# Altium PCB Main-PCB-v1.0.PcbDoc (part 3 of 5)
Units mil, origin at the board's own origin, x right, y up, seen from the top; angles counter-clockwise.
Board outline 8760 x 2778 mil, 2 copper layers (Top Layer, Bottom Layer), stack 57 mil thick; 252 components, 204 nets, 813 pads, 473 vias.
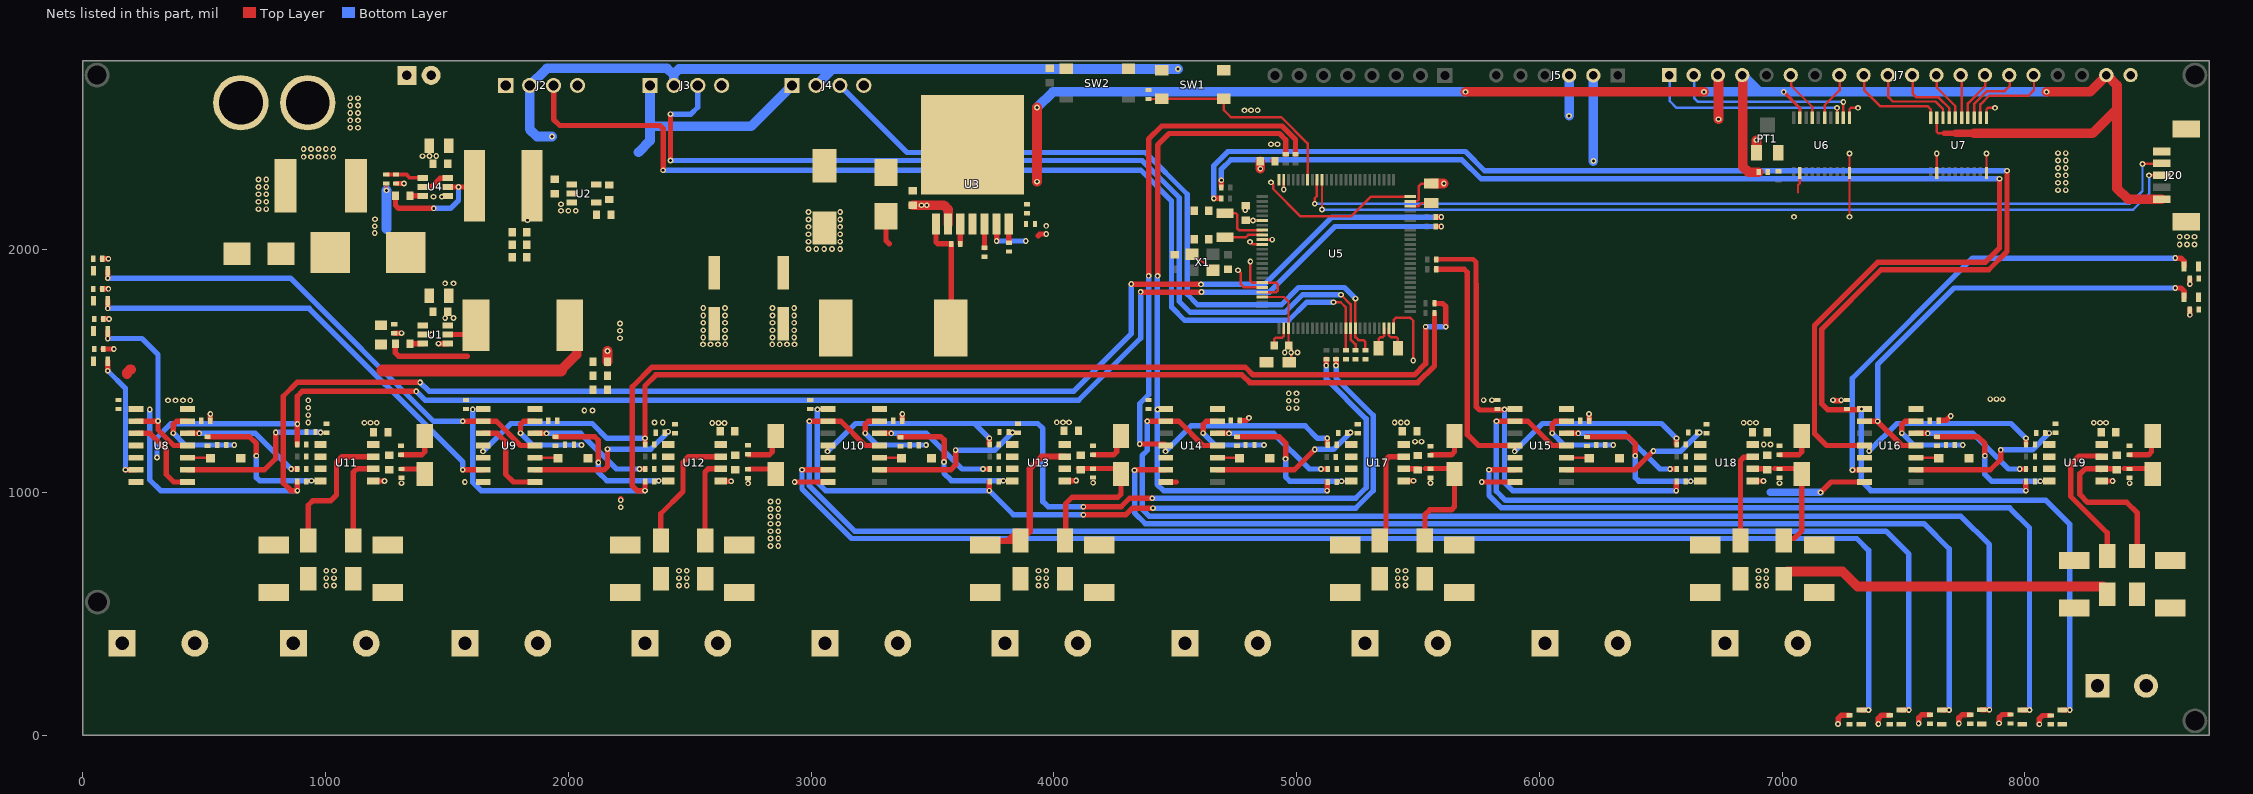
[diagram p2: the nets of this part, all layers, seen from the top]

## Part data (continued)
R24 R25 R26 R39 R41 R43 R51 R52 R53 R54 R55 R56 R57 R58 R59 R72 R74 R76 R84 R85 R86 R87 R88 R89: library part RC0402FR-074K7L, "RES 4.7K OHM 1% 1/16W 0402", Case Code (Imperial)=0402, Case Code (Metric)=1005, LCSC Part Number=C105871, Manufacturer=Yageo, Max Operating Temperature=155°C, Max Power Dissipation=63mW, Min Operating Temperature=-55°C, Power Rating=62.5mW, Resistance=4.7kR, Resistance Tolerance=1%, Resistor Type="Thick Film", Temperature Coefficient=100ppm/°C, Voltage Rating=50V, Case/Package=0402, Category="Chip SMD Resistors", ComponentLink1Description=https://datasheet.ciiva.com/22661/1686128-22661342.pdf?src-supplier=Element14, ComponentLink1URL=https://datasheet.ciiva.com/22661/1686128-22661342.pdf?src-supplier=Element14, ComponentLink2Description=https://datasheet.ciiva.com/7850/1018594-7850022.pdf?src-supplier=Element14, ComponentLink2URL=https://datasheet.ciiva.com/7850/1018594-7850022.pdf?src-supplier=Element14, ComponentLink3Description=https://datasheet.ciiva.com/7850/1018594-7850023.pdf?src-supplier=Element14, ComponentLink3URL=https://datasheet.ciiva.com/7850/1018594-7850023.pdf?src-supplier=Element14, ComponentLink4Description=https://datasheet.ciiva.com/15215/getdatasheetpartid-328119-15215035.pdf?src-supplier=Verical, ComponentLink4URL=https://datasheet.ciiva.com/15215/getdatasheetpartid-328119-15215035.pdf?src-supplier=Verical, Construction=Rectangular, Depth=0.5mm, Features="Moisture Resistant", Height=0.32mm, Height - Seated (Max)=0.016inch, Item Type=Resistor, Lead Free="Lead Free", Length=1mm, Manufacturer Part Number=RC0402FR-074K7L, Military Standard=Not, Number of Pins=2, Number of Terminations=2, Packaging="Tape and Reel", Pricing 1="10000=0.00085 (USD)", Reach SVHC Compliant=Yes, RoHS=Yes, RoHS Compliant=Yes, Series=RC, Size Code=0402, Stock 1=2420000, Supplier 1=Avnet, Supplier Part Number 1=RC0402FR-074K7L, Termination=SMD/SMT, Tolerance=1%, Voltage Rating (DC)=50V, Width=0.5mm
R27 R28 R29 R30 R31 R32 R60 R61 R62 R63 R64 R65: library part RC0402FR-072K4L, "RES 2.4K OHM 1% 1/16W 0402", Case Code (Imperial)=0402, Case Code (Metric)=1005, LCSC Part Number=C112296, Manufacturer=Yageo, Max Operating Temperature=155°C, Max Power Dissipation=63mW, Min Operating Temperature=-55°C, Package Quantity=1, Resistance Tolerance=1%, Resistor Type="Thick Film", Supplier Part Number 1=3635539, Temperature Coefficient=100ppm/°C, Voltage Rating=50V, Case/Package=0402, Category="Chip SMD Resistors", ComponentLink1Description=https://datasheet.ciiva.com/7849/1018594-7849930.pdf?src-supplier=Element14, ComponentLink1URL=https://datasheet.ciiva.com/7849/1018594-7849930.pdf?src-supplier=Element14, ComponentLink2Description=https://datasheet.ciiva.com/7849/1018594-7849931.pdf?src-supplier=Element14, ComponentLink2URL=https://datasheet.ciiva.com/7849/1018594-7849931.pdf?src-supplier=Element14, ComponentLink3Description=https://datasheet.ciiva.com/2453/pyu-r-int-thick-7-2453428.pdf?src-supplier=Digi-Key, ComponentLink3URL=https://datasheet.ciiva.com/2453/pyu-r-int-thick-7-2453428.pdf?src-supplier=Digi-Key, ComponentLink4Description=https://datasheet.ciiva.com/2453/pyu-r-int-thick-7-2453429.pdf?src-supplier=Digi-Key, ComponentLink4URL=https://datasheet.ciiva.com/2453/pyu-r-int-thick-7-2453429.pdf?src-supplier=Digi-Key, ComponentLink5Description=https://datasheet.ciiva.com/2453/pyu-r-int-thick-7-2453427.pdf?src-supplier=Digi-Key, ComponentLink5URL=https://datasheet.ciiva.com/2453/pyu-r-int-thick-7-2453427.pdf?src-supplier=Digi-Key, ComponentLink6Description=https://datasheet.ciiva.com/12667/pyu-rc0402-51-rohs-l-6-r-12667437.pdf?src-supplier=Mouser, ComponentLink6URL=https://datasheet.ciiva.com/12667/pyu-rc0402-51-rohs-l-6-r-12667437.pdf?src-supplier=Mouser, ComponentLink7Description=https://datasheet.ciiva.com/17423/pyu-rc0402-51-rohs-l-6-r-17423915.pdf?src-supplier=Future+Electronics, ComponentLink7URL=https://datasheet.ciiva.com/17423/pyu-rc0402-51-rohs-l-6-r-17423915.pdf?src-supplier=Future+Electronics, Construction=Rectangular, Depth=0.5mm, Features="Moisture Resistant", Height=0.016inch, Item Type=Resistor, Lead Free="Lead Free", Length=0.039inch, Manufacturer Part Number=RC0402FR-072K4L, Military Standard=Not, Number of Terminations=2, Packaging="Tape and Reel", Power Rating=63mW, Pricing 1="10000=0.001, 50000=0.001, 200000=0.0009, 300000=0.0009, 750000=0.0009, 1000000=0.0009, 2000000=0.0009, 3000000=0.0008, 7500000=0.0008 (USD)", Reach SVHC Compliant=Unknown, RoHS=Yes, RoHS Compliant=Yes, Series=RC, Stock 1=20000, Supplier 1="Future Electronics", Termination=SMD/SMT, Tolerance=1%, Voltage Rating (DC)=50V, Width=0.02inch
R33 R34 R35 R66 R67 R68: library part RC0402FR-0756KL, "RES 56K OHM 1% 1/16W 0402", Case Code (Imperial)=0402, Case Code (Metric)=1005, LCSC Part Number=C114756, Manufacturer=Yageo, Max Operating Temperature=155°C, Max Power Dissipation=63mW, Min Operating Temperature=-55°C, Package Quantity=1, Power Rating=62.5mW, Resistance Tolerance=1%, Resistor Type="Thick Film", Supplier Part Number 1=3873767, Temperature Coefficient=100ppm/°C, Voltage Rating=50V, Case/Package=0402, Category="Chip SMD Resistors", ComponentLink1Description=https://datasheet.ciiva.com/46412/1018594-46412840.pdf?src-supplier=Element14, ComponentLink1URL=https://datasheet.ciiva.com/46412/1018594-46412840.pdf?src-supplier=Element14, ComponentLink2Description=https://datasheet.ciiva.com/2453/pyu-r-int-thick-7-2453479.pdf?src-supplier=Digi-Key, ComponentLink2URL=https://datasheet.ciiva.com/2453/pyu-r-int-thick-7-2453479.pdf?src-supplier=Digi-Key, ComponentLink3Description=https://datasheet.ciiva.com/2453/pyu-r-int-thick-7-2453480.pdf?src-supplier=Digi-Key, ComponentLink3URL=https://datasheet.ciiva.com/2453/pyu-r-int-thick-7-2453480.pdf?src-supplier=Digi-Key, ComponentLink4Description=https://datasheet.ciiva.com/2453/pyu-r-int-thick-7-2453478.pdf?src-supplier=Digi-Key, ComponentLink4URL=https://datasheet.ciiva.com/2453/pyu-r-int-thick-7-2453478.pdf?src-supplier=Digi-Key, ComponentLink5Description=https://datasheet.ciiva.com/5558/pyu-rc0402-51-rohs-l-6-r-5558279.pdf?src-supplier=Mouser, ComponentLink5URL=https://datasheet.ciiva.com/5558/pyu-rc0402-51-rohs-l-6-r-5558279.pdf?src-supplier=Mouser, ComponentLink6Description=https://datasheet.ciiva.com/7850/1018594-7850045.pdf?src-supplier=Element14, ComponentLink6URL=https://datasheet.ciiva.com/7850/1018594-7850045.pdf?src-supplier=Element14, ComponentLink7Description=https://datasheet.ciiva.com/7850/1018594-7850044.pdf?src-supplier=Element14, ComponentLink7URL=https://datasheet.ciiva.com/7850/1018594-7850044.pdf?src-supplier=Element14, Construction=Rectangular, Depth=0.5mm, Features="Moisture Resistant", Height=0.016inch, Item Type=Resistor, Lead Free="Lead Free", Length=0.039inch, Manufacturer Part Number=RC0402FR-0756KL, Military Standard=Not, Number of Terminations=2, Packaging="Tape and Reel", Pricing 1="10000=0.001, 50000=0.001, 300000=0.0009, 1000000=0.0009, 3000000=0.0008 (USD)", Reach SVHC Compliant=No, RoHS=Yes, RoHS Compliant=Yes, Series=RC, Stock 1=2610000, Supplier 1="Future Electronics", Technology="THICK FILM", Termination=SMD/SMT, Tolerance=1%, Width=0.02inch, Working Voltage=50V
R48 R49 R50 R81 R82 R83: library part RC0603FR-07120RL, "RES 120 OHM 1% 1/10W 0603", Case Code (Imperial)=0603, Case Code (Metric)=1608, LCSC Part Number=C114640, Manufacturer=Yageo, Max Operating Temperature=155°C, Max Power Dissipation=100mW, Min Operating Temperature=-55°C, Package Quantity=1, Resistance Tolerance=1%, Resistor Type="Thick Film", Supplier Part Number 1=311-120HRCT-ND, Temperature Coefficient=100ppm/°C, Voltage Rating=50V, Case/Package=0603, Category="Chip SMD Resistors", ComponentLink1Description=https://datasheet.ciiva.com/2553/pyu-r-int-thick-7-2553512.pdf?src-supplier=Digi-Key, ComponentLink1URL=https://datasheet.ciiva.com/2553/pyu-r-int-thick-7-2553512.pdf?src-supplier=Digi-Key, ComponentLink2Description=https://datasheet.ciiva.com/7746/443971-7746248.pdf?src-supplier=Element14, ComponentLink2URL=https://datasheet.ciiva.com/7746/443971-7746248.pdf?src-supplier=Element14, ComponentLink3Description=https://datasheet.ciiva.com/2553/pyu-r-int-thick-7-2553513.pdf?src-supplier=Digi-Key, ComponentLink3URL=https://datasheet.ciiva.com/2553/pyu-r-int-thick-7-2553513.pdf?src-supplier=Digi-Key, ComponentLink4Description=https://datasheet.ciiva.com/7746/443971-7746249.pdf?src-supplier=Element14, ComponentLink4URL=https://datasheet.ciiva.com/7746/443971-7746249.pdf?src-supplier=Element14, ComponentLink5Description=https://datasheet.ciiva.com/2553/pyu-r-int-thick-7-2553514.pdf?src-supplier=Digi-Key, ComponentLink5URL=https://datasheet.ciiva.com/2553/pyu-r-int-thick-7-2553514.pdf?src-supplier=Digi-Key, ComponentLink6Description=https://datasheet.ciiva.com/46395/443971-46395021.pdf?src-supplier=Element14, ComponentLink6URL=https://datasheet.ciiva.com/46395/443971-46395021.pdf?src-supplier=Element14, Construction=Rectangular, Depth=0.8mm, Features="Moisture Resistant", Height=0.022inch, Lead Free="Lead Free", Length=1.6mm, Manufacturer Part Number=RC0603FR-07120RL, Military Standard=Not, Number of Pins=2, Number of Terminations=2, Packaging="Tape and Reel", Power Rating=100mW, Pricing 1="1=0.10000, 10=0.02400, 100=0.00970, 1000=0.00436, 2500=0.00378 (USD)", REACH SVHC="No SVHC", Resistance=120R, RoHS=Yes, RoHS Compliant=Yes, Series=RC, Size Code=0603, Stock 1=839061, Supplier 1=Digi-Key, Termination=SMD/SMT, Tolerance=1%, Voltage Rating (DC)=50V, Width=0.031inch
SB1 SB2 SB3 SB4 SB5 SB6 SB7 SB8 SB9 SB10 SB11 SB12 SB13 SB14 SB15 SB16 SB17 SB18 SB19 SB20: "Solder Bridge ON", Item Type="Solder Bridge", Manufacturer Part Number="Solder Bridge 0402"
SW1 SW2: "No NO 50mA 4.5mm 100000 260gf 12V -30℃~+85℃ 4.5mm 4.3mm Black Round Button Brick nogging SPST SMD Tactile Switches ROHS", LCSC Part Number=C381037, Manufacturer="XKB Connectivity", Package=Custom, ComponentLink1Description=LCSC, ComponentLink1URL=https://www.lcsc.com/product-detail/Tactile-Switches_XKB-Connectivity-TS-1109S-C-B_C381037.html, Item Type=Switch, Manufacturer Part Number=TS-1109S-C-B
U1 U4: "IC REG BUCK ADJ 2A SOT23-THIN", LCSC Part Number=C5383002, Manufacturer="Texas Instruments", Supplier Part Number 1=595-LMR51420YDDCR, Category="Integrated Circuits (ICs)", ComponentLink1Description=LCSC, ComponentLink1URL=https://www.lcsc.com/product-detail/DC-DC-Converters_Texas-Instruments-LMR51420YDDCR_C5383002.html, Item Type=IC, Manufacturer Part Number=LMR51420YDDCR, Pricing 1="1=1.56, 10=1.41, 50=1.33, 100=1.13, 1000=0.77, 10000=0.769 (USD)", RoHS=No, Stock 1=6752, Supplier 1=Mouser
U2: "SPX3819 Series 3.3 V 500 mA Fixed Output SMT LDO Regulator - SOT-23-5", LCSC Part Number=C9055, Manufacturer=MaxLinear, Supplier Part Number 1=23R9703, Category="Voltage Regulators - Linear", ComponentLink1Description=LCSC, ComponentLink1URL=https://www.lcsc.com/product-detail/Linear-Voltage-Regulators-LDO_MaxLinear-SPX3819M5-L-3-3-TR_C9055.html, Item Type=IC, Manufacturer Part Number=SPX3819M5-L-3-3/TR, RoHS=Yes, RoHS Compliant=Yes, Supplier 1=Newark
U3: "IC REG BUCK ADJ 5A TO263-7", Case/Package=TO-263, LCSC Part Number=C2877272, Manufacturer="TI National Semiconductor", Max Operating Temperature=125°C, Max Supply Voltage=40V, Min Input Voltage=8V, Min Operating Temperature=-40°C, Output Current=5A, Output Voltage=37V, Package Quantity=500, Quiescent Current=4.2mA, Supplier Part Number 1=926-LM2679SXADJNOPB, Switching Frequency=260kHz, Category="Voltage Regulators - Switching", ComponentLink1Description=https://datasheet.ciiva.com/6596/lm2679-6596695.pdf?src-supplier=Digi-Key, ComponentLink1URL=https://datasheet.ciiva.com/6596/lm2679-6596695.pdf?src-supplier=Digi-Key, ComponentLink2Description=https://datasheet.ciiva.com/6596/lm2679-6596699.pdf?src-supplier=Digi-Key, ComponentLink2URL=https://datasheet.ciiva.com/6596/lm2679-6596699.pdf?src-supplier=Digi-Key, ComponentLink3Description=https://datasheet.ciiva.com/6596/lm2679-6596693.pdf?src-supplier=Digi-Key, ComponentLink3URL=https://datasheet.ciiva.com/6596/lm2679-6596693.pdf?src-supplier=Digi-Key, ComponentLink4Description=https://datasheet.ciiva.com/41457/001013915-da-01-en-ic-reg-bu-lm2679sx-adj-nopb-to-263-7-tid-41457948.pdf?src-supplier=Conrad, ComponentLink4URL=https://datasheet.ciiva.com/41457/001013915-da-01-en-ic-reg-bu-lm2679sx-adj-nopb-to-263-7-tid-41457948.pdf?src-supplier=Conrad, Efficiency=84%, Item Type=IC, Lead Free="Contains Lead", Manufacturer Part Number=LM2679SX-ADJ/NOPB, Min Supply Voltage=8V, Mounting Technology="Surface Mount", Number of Outputs=1, Output Type=Adjustable, Packaging="Tape and Reel", Pricing 1="1=6.97, 10=6.26, 50=5.92, 100=5.13, 1000=3.72, 10000=3.72 (USD)", RoHS=Yes, RoHS Compliant=Yes, Series="SIMPLE SWITCHER®", Stock 1=3995, Supplier 1=Mouser, Synchronous Rectifier=No
U5: "MCU 32-bit ARM Cortex M4 RISC 1MB Flash 3.3V 100-Pin LQFP Frame", Case/Package=LQFP, LCSC Part Number=C1337293, Manufacturer=STMicroelectronics, Max Operating Temperature=85°C, Min Operating Temperature=-40°C, Supplier Part Number 1=511-STM32F413VGT6, Category=Microcontrollers, ComponentLink1Description=https://4donline.ihs.com/images/VipMasterIC/IC/SGST/SGST-S-A0003533273/SGST-S-A0003533273-1.pdf?hkey=52A5661711E402568146F3353EA87419&src-supplier=Newark, ComponentLink1URL=https://4donline.ihs.com/images/VipMasterIC/IC/SGST/SGST-S-A0003533273/SGST-S-A0003533273-1.pdf?hkey=52A5661711E402568146F3353EA87419&src-supplier=Newark, ComponentLink2Description=https://4donline.ihs.com/images/VipMasterIC/IC/SGST/SGST-S-A0003533273/SGST-S-A0003533273-1.pdf?hkey=52A5661711E402568146F3353EA87419&src-supplier=Farnell, ComponentLink2URL=https://4donline.ihs.com/images/VipMasterIC/IC/SGST/SGST-S-A0003533273/SGST-S-A0003533273-1.pdf?hkey=52A5661711E402568146F3353EA87419&src-supplier=Farnell, ComponentLink3Description=http://www.farnell.com/datasheets/2581760.pdf?src-supplier=Element14, ComponentLink3URL=http://www.farnell.com/datasheets/2581760.pdf?src-supplier=Element14, ComponentLink4Description=http://www.st.com/content/ccc/resource/technical/document/datasheet/group3/f6/1d/4a/d9/f9/96/43/2a/DM00282249/files/DM00282249.pdf/jcr:content/translations/en.DM00282249.pdf?src-supplier=Digi-Key, ComponentLink4URL=http://www.st.com/content/ccc/resource/technical/document/datasheet/group3/f6/1d/4a/d9/f9/96/43/2a/DM00282249/files/DM00282249.pdf/jcr:content/translations/en.DM00282249.pdf?src-supplier=Digi-Key, Core Architecture=ARM, Interface=I2C,SPI,USB,IrDA,MMC,SDIO,UART,USART,EBI/EMI, Item Type=IC, Manufacturer Part Number=STM32F413VGT6, Memory Format=FLASH, Memory Size=1MB, Number of I/Os=81, Oscillator Type=Internal, Packaging=Tray, Peripherals="Brown-out Detect/Reset,POR,PWM,WDT,DMA,LCD", Pricing 1="1=14.15, 10=13, 50=12.46, 100=10.98, 1000=9.77, 10000=9.77 (USD)", RoHS=Yes, RoHS Compliant=Yes, Series=STM32F4, Stock 1=941, Supplier 1=Mouser
U6 U7: "IC 8-BIT TRNSTR 15KV ESD 20TSSOP", Case/Package=TSSOP, High Level Output Current=-20uA, LCSC Part Number=C53406, Low Level Output Current=20uA, Manufacturer="Texas Instruments", Max Operating Temperature=85°C, Max Supply Voltage=5.5V, Min Operating Temperature=-40°C, Min Supply Voltage=1.2V, Package Quantity=2000, Quiescent Current=3.5uA, Supplier Part Number 1=595-TXB0108PWR, Category="Logic ICs", Channel Type=Bidirectional, ComponentLink1Description=https://datasheet.ciiva.com/1508/1789049-1508727.pdf?src-supplier=Element14, ComponentLink1URL=https://datasheet.ciiva.com/1508/1789049-1508727.pdf?src-supplier=Element14, ComponentLink2Description=https://datasheet.ciiva.com/22653/1633674-22653426.pdf?src-supplier=Farnell, ComponentLink2URL=https://datasheet.ciiva.com/22653/1633674-22653426.pdf?src-supplier=Farnell, ComponentLink3Description=https://datasheet.ciiva.com/1628/txb0108-1628712.pdf?src-supplier=Newark, ComponentLink3URL=https://datasheet.ciiva.com/1628/txb0108-1628712.pdf?src-supplier=Newark, ComponentLink4Description=https://datasheet.ciiva.com/4834/sces643e-127095-4834434.pdf?src-supplier=Mouser, ComponentLink4URL=https://datasheet.ciiva.com/4834/sces643e-127095-4834434.pdf?src-supplier=Mouser, ComponentLink5Description=https://datasheet.ciiva.com/15096/getdatasheetpartid-189652-15096226.pdf?src-supplier=Verical, ComponentLink5URL=https://datasheet.ciiva.com/15096/getdatasheetpartid-189652-15096226.pdf?src-supplier=Verical, ComponentLink6Description=https://datasheet.ciiva.com/28499/1811182-28499660.pdf?src-supplier=Element14, ComponentLink6URL=https://datasheet.ciiva.com/28499/1811182-28499660.pdf?src-supplier=Element14, ComponentLink7Description=https://datasheet.ciiva.com/1899/txb0108-1899608.pdf?src-supplier=Digi-Key, ComponentLink7URL=https://datasheet.ciiva.com/1899/txb0108-1899608.pdf?src-supplier=Digi-Key, ComponentLink8Description=https://datasheet.ciiva.com/1899/txb0108-1899607.pdf?src-supplier=Digi-Key, ComponentLink8URL=https://datasheet.ciiva.com/1899/txb0108-1899607.pdf?src-supplier=Digi-Key, ComponentLink9Description=https://datasheet.ciiva.com/1899/txb0108-1899609.pdf?src-supplier=Digi-Key, ComponentLink9URL=https://datasheet.ciiva.com/1899/txb0108-1899609.pdf?src-supplier=Digi-Key, ComponentLink10Description=https://datasheet.ciiva.com/14287/txb0108-14287509.pdf?src-supplier=Avnet, ComponentLink10URL=https://datasheet.ciiva.com/14287/txb0108-14287509.pdf?src-supplier=Avnet, ComponentLink11Description=https://datasheet.ciiva.com/48701/001073833-da-01-en-ic-8-bit-trnstr-txb0108pwr-tssop-20-tid-48701979.pdf?src-supplier=Conrad, ComponentLink11URL=https://datasheet.ciiva.com/48701/001073833-da-01-en-ic-8-bit-trnstr-txb0108pwr-tssop-20-tid-48701979.pdf?src-supplier=Conrad, Data Rate=100Mbps, Height=1.15mm, Item Type=IC, Lead Free="Lead Free", Length=6.5mm, Logic Function=Translator, Manufacturer Part Number=TXB0108PWR, Mounting Technology="Surface Mount", Number of Bits=8, Number of Channels=8, Number of Circuits=1, Number of Inputs=8, Output Current=20uA, Output Type=3-STATE, Packaging="Tape and Reel", Pins=20, Pricing 1="1=1.73, 10=1.55, 50=1.47, 100=1.21, 1000=0.789, 10000=0.694 (USD)", Propagation Delay=4ns, Radiation Hardening=No, Reach SVHC Compliant=No, Rise Time=7.3ns, RoHS=Yes, RoHS Compliant=Yes, Series=-, Stock 1=134319, Supplier 1=Mouser, Termination=SMD/SMT, Turn-On Delay Time=9.5ns, Weight=0.002716oz, Width=4.4mm
U8 U9 U10 U14 U15 U16: "6 16ns@6V,50pF 2uA 2V~6V SOIC-14-208mil Inverters ROHS", Case/Package=SOP, High Level Output Current=-5.2mA, LCSC Part Number=C6812, Low Level Output Current=5.2mA, Manufacturer="Texas Instruments", Max Operating Temperature=85°C, Max Supply Voltage=6V, Min Operating Temperature=-40°C, Min Supply Voltage=2V, Operating Supply Voltage=5V, Package Quantity=1, Quiescent Current=2uA, Supplier Part Number 1=296-12883-1-ND, Category="Logic Gates", ComponentLink1Description=https://datasheet.ciiva.com/15089/getdatasheetpartid-409522-15089683.pdf?src-supplier=Verical, ComponentLink1URL=https://datasheet.ciiva.com/15089/getdatasheetpartid-409522-15089683.pdf?src-supplier=Verical, ComponentLink2Description=https://datasheet.ciiva.com/46439/1834038-46439813.pdf?src-supplier=Element14, ComponentLink2URL=https://datasheet.ciiva.com/46439/1834038-46439813.pdf?src-supplier=Element14, ComponentLink3Description=https://datasheet.ciiva.com/1864/sn74hc04-1864851.pdf?src-supplier=Digi-Key, ComponentLink3URL=https://datasheet.ciiva.com/1864/sn74hc04-1864851.pdf?src-supplier=Digi-Key, ComponentLink4Description=https://datasheet.ciiva.com/1864/sn74hc04-1864850.pdf?src-supplier=Digi-Key, ComponentLink4URL=https://datasheet.ciiva.com/1864/sn74hc04-1864850.pdf?src-supplier=Digi-Key, ComponentLink5Description=https://datasheet.ciiva.com/1864/sn74hc04-1864852.pdf?src-supplier=Digi-Key, ComponentLink5URL=https://datasheet.ciiva.com/1864/sn74hc04-1864852.pdf?src-supplier=Digi-Key, ComponentLink6Description=https://datasheet.ciiva.com/14292/sn54hc04-sp-14292233.pdf?src-supplier=Avnet, ComponentLink6URL=https://datasheet.ciiva.com/14292/sn54hc04-sp-14292233.pdf?src-supplier=Avnet, ComponentLink7Description=https://datasheet.ciiva.com/14288/sn54hc04-sp-14288839.pdf?src-supplier=Avnet, ComponentLink7URL=https://datasheet.ciiva.com/14288/sn54hc04-sp-14288839.pdf?src-supplier=Avnet, Item Type=IC, Lead Free="Lead Free", Logic Function=Buffer,Inverter, Manufacturer Part Number=SN74HC04NSR, Mounting Technology="Surface Mount", Number of Bits=6, Number of Circuits=6, Number of Elements=6, Number of Gates=6, Number of Inputs=1, Packaging="Tape and Reel", Pins=14, Pricing 1="1=0.74, 10=0.65, 25=0.6108, 100=0.4984, 250=0.46296, 500=0.394, 1000=0.3152 (USD)", Propagation Delay=120ns, Radiation Hardening=No, Reach SVHC Compliant=No, RoHS=Yes, RoHS Compliant=Yes, Series=74HC, Stock 1=1936, Supplier 1=Digi-Key, Technology=CMOS, Turn-On Delay Time=20ns, Weight=0.007348oz
U11 U12 U13 U17 U18 U19: "SOP-8 RS-485/RS-422 ICs ROHS", LCSC Part Number=C519086, Manufacturer=HGSEMI, Package=SOP-8, ComponentLink1Description=LCSC, ComponentLink1URL=https://www.lcsc.com/product-detail/RS-485-RS-422-ICs_HGSEMI-SP3485EIM-TR_C519086.html, Item Type=IC, Manufacturer Part Number=SP3485EIM/TR
X1: "16MHz SMD Crystal Resonator 9pF ±10ppm ±30ppm -40℃~+85℃ SMD3225-4P Crystals ROHS", LCSC Part Number=C13738, Manufacturer="Yangxing Tech", Package=SMD3225-4P, ComponentLink1Description=LCSC, ComponentLink1URL=https://www.lcsc.com/product-detail/Crystals_Yangxing-Tech-X322516MLB4SI_C13738.html, Item Type=Crystal, Manufacturer Part Number=X322516MLB4SI
X2: library part NX3215SA-32.768K-STD-MUA-14, "CRYSTAL 32.7680KHZ 6PF SMD", Case/Package=SMD/SMT, ESR (Equivalent Series Resistance)=70kR, Frequency=32.768kHz, Frequency Tolerance=20ppm, LCSC Part Number=C156244, Load Capacitance=6pF, Manufacturer=NDK, Max Operating Temperature=85°C, Min Operating Temperature=-40°C, Supplier Part Number 1=1847854, Category=Crystals, ComponentLink1Description=https://datasheet.ciiva.com/6733/c-nx3215sa-std-mua-9-e-6733110.pdf?src-supplier=Digi-Key, ComponentLink1URL=https://datasheet.ciiva.com/6733/c-nx3215sa-std-mua-9-e-6733110.pdf?src-supplier=Digi-Key, ComponentLink2Description=https://datasheet.ciiva.com/6733/c-nx3215sa-std-mua-9-e-6733111.pdf?src-supplier=Digi-Key, ComponentLink2URL=https://datasheet.ciiva.com/6733/c-nx3215sa-std-mua-9-e-6733111.pdf?src-supplier=Digi-Key, ComponentLink3Description=https://datasheet.ciiva.com/6733/c-nx3215sa-std-mua-9-e-6733112.pdf?src-supplier=Digi-Key, ComponentLink3URL=https://datasheet.ciiva.com/6733/c-nx3215sa-std-mua-9-e-6733112.pdf?src-supplier=Digi-Key, Item Type=Crystal, Manufacturer Part Number=NX3215SA-32.768K-STD-MUA-14, Mounting Technology="Surface Mount", Packaging="Cut Tape", Pricing 1="5=0.15520, 50=0.68600, 100=0.66600, 250=0.65000, 500=0.63400 (GBP)", RoHS=Yes, RoHS Compliant=Yes, Series=NX3215SA, Stock 1=500, Supplier 1=Rs

## Free pads (board coordinates)
  round 102.36 hole 78.74 mask+1.97: MH(59,2719) MH(61,548) MH(8701,2719) MH(8701,59)

## Via types
v1: diameter 23.62, hole 11.81, Top Layer to Bottom Layer, 473 vias

## Nets (pads, with @x,y where several pads share a name; then routed paths per layer and width w, separated by ;. In a path a pad name is that pad's centre, name@x,y a point inside that pad or via, vN(x,y) a via of type N, cw(c..) or ccw(c..) an arc to the next point about the centre after c; other vN are vias at no path point)
3.3V: C11.1 C22.1 C23.2 C24.2 C26.2 C36.2 C37.2 C38.2 C42.2 C43.2 C44.2 J2.2 J3.2 J4.2 J5.2 R24.2 R25.2 R26.2 R39.2 R41.2 R43.2 R52.1 R54.1 R56.1 R57.2 R58.2 R59.2 R72.2 R74.2 R76.2 R85.1 R87.1 R89.1 SW1.3 SW1.4 U2.5 U5.6 U5.11 U5.19 U5.21 U5.22 U5.28 U5.50 U5.75 U5.100 U6.2 U6.10 U7.2 U7.10 U8.14 U9.14 U10.14 U11.8 U12.8 U13.8 U14.14 U15.14 U16.14 U17.8 U18.8 U19.8 | length 5786.1
  Top Layer w10: C24.2@4790.8,2121 4792,2119.8 v1(4821,2119.8) U5.6@4858.68,2119.8 ; v1(4808,2032) 4808,2031 4817.63,2021.37 U5.11@4858.68,2021.37 ; v1(4810,1951) 4810,1871 4817.11,1863.89 U5.19@4858.68,1863.89 4916.14,1863.89 4922,1858.03 4922,1830.38 4916.14,1824.52 U5.21@4858.68,1824.52 ; U5.22@4858.68,1804.83 4948.17,1804.83 4966.94,1786.06 U5.28@4966.94,1676.88 4966.94,1605 4977.8,1594.15 4977.8,1576.2 v1(4978,1576) 4978,1547.06 C22.1@4966.94,1536 ; v1@4894,2278 v1(4895,2277) ; 4895,2369 C26.2@4908.5,2355.5 ; 4904,2269 4904,2250 5017,2137 5225,2137 5306.22,2218.22 U5.75@5468.91,2218.22 ; U5.50@5400.02,1676.88 5400.02,1710.02 5409,1719 5469,1719 5481,1707 v1(5481,1543) ; 7066,2237 7066,2266 7073.43,2273.43 U6.2@7073.43,2314.83 ; v1(7278.16,2134.84) U6.10@7278.16,2314.83 v1(7278.16,2395.64) ; U7.2@7637.64,2314.83 v1(7637.64,2395.64) ; U7.10@7842.36,2314.83 v1(7842.36,2395.64)
  Top Layer w22: v1@7217,1379 7216,1378 v1@7242,1378
  Bottom Layer w40: v1(1933,2466) 1871,2466 1841.15,2495.85 J2.2@1841.15,2676.48 1911.5,2746.83 2407.39,2746.83 2430.83,2723.4 ; J3.2@2435.15,2676.48 2435.15,2723.15 2456,2744 3088.09,2744 ; J4.2@3020.57,2676.48 3088.09,2744 ; v1(4512,2744) 3088.09,2744 ; v1(6223,2365) J5.2@6223,2717.56
  other v1: 2741,1037 1313,1038 6990,1038 8432,1038 4162.2,1039.5 5552.2,1039 2593,1286 2618.5,1286 2644,1286 929,1287.5 1160,1287 1185.5,1287 1211,1287 2355.2,1287.5 2389.2,1287.5 6842,1287 6867.5,1287 6893,1287 8284,1287 8309.5,1287 8335,1287 5404.2,1288 5429.7,1288 5455.2,1288 4012.2,1288.5 4037.7,1288.5 4063.2,1288.5 929,1318 2066.2,1337.5 2100.2,1337.5 4968,1347 5000,1347 929,1348.5 4968,1377.5 5000,1377.5 351.5,1379 382,1379 412.5,1379 443,1379 929,1379 5771,1380 5805,1380 7210,1380 7244,1380 7858,1384 7883.5,1384 7909,1384 4968,1408 5000,1408 4951.5,1576 5004.5,1576 7049,2134.84 8137,2245 8169,2245 8137,2275.5 8169,2275.5 8137,2306 8169,2306 8137,2336.5 8169,2336.5 8137,2367 8169,2367 8137,2397.5 8169,2397.5 4895,2434 4922,2434 4785.99,2573.72 4813,2574 4840,2574
5V: C5.2 C18.2 C20.2 C21.2 J2.1 J3.1 J4.1 J7.4 J7.19 J20.1 L3.2 R3.2 SB1.1 U2.1 U2.3 U6.19 U7.19 | length 8125.3
  Top Layer w10: R3.2@1250.2,2272.5 1250.6,2272.1 1250.6,2244.4 v1(1251,2244) ; U7.19@7637.64,2543.17 7637.64,2484.86 7643.5,2479 7668,2479
  Top Layer w12: v1(7007,2650) 7073.43,2583.57 U6.19@7073.43,2543.17
  Top Layer w22: 7668,2479 7715,2479
  Top Layer w30: 7715,2479 7791,2479
  Top Layer w40: v1(3931,2280) v1(3931,2585) ; v1(5696,2650) v1(6679,2650) ; J7.4@6838,2719 6838,2342.43 6861.43,2319 SB1.1@6904.5,2319 ; 7791,2479 8279,2479 8380,2580 ; v1(8090,2650) 8269,2650 8338,2719 8380,2677 8380,2580 ; J20.1@8564.61,2207.52 8424.48,2207.52 8380,2252 8380,2580
  Bottom Layer w40: 1251,2085 v1(1251,2244) ; 2289,2401 2336.72,2448.72 2336.72,2514 ; J3.1@2336.72,2676.48 2336.72,2514 ; J4.1@2922.15,2676.48 2753.67,2508 2342.72,2508 2336.72,2514 ; v1(3931,2585) 3996,2650 v1(5696,2650) ; v1(6679,2650) 6907,2650 ; J7.4@6838,2719 6907,2650 ; v1(8090,2650) v1(7007,2650) 6907,2650
  other v1: 1832,2121 1970,2160 2000.5,2160 2031,2160 1970,2187
12V: C4.2 C6.2 C8.2 J8.1 J10.1 L1.2 R1.2 | length 887.1
  Top Layer w40: 182,1488 182,1494 194,1506 200,1506 ; 1969,1502 2034.5,1567.5 L1.2@2034.5,1599
  Top Layer w50: 1235,1502 1969,1502
24V: C17.1 C19.1 J12.1 J14.1 J16.1 L2.2 R5.1 | length 36.9
  Top Layer w22: v1@2216,972 v1@2216,973 ; 3936,2057 3943,2064 v1(3969,2064)
  other v1: 2833,779 2865,779 2833,809.5 2865,809.5 2833,840 2865,840 2833,870.5 2865,870.5 2833,901 2865,901 2833,931.5 2865,931.5 2216,938.5 2833,962 2865,962 2216,968 2555.5,1609.8 2586,1609.8 2616.5,1609.8 2647,1609.8 2840.5,1609.8 2871,1609.8 2901.5,1609.8 2932,1609.8 2213,1635 2556,1637.5 2645.59,1637.5 2841,1637.5 2930.59,1637.5 2213,1665.5 2556,1668 2645.59,1668 2841,1668 2930.59,1668 2213,1696 2556,1698.5 2645.59,1698.5 2841,1698.5 2930.59,1698.5 2556,1729 2645.59,1729 2841,1729 2930.59,1729 2556,1759.5 2645.59,1759.5 2841,1759.5 2930.59,1759.5 3969,2098
BATT: C1.2 C2.2 C9.1 C10.2 C13.2 C14.2 J1.2 U1.3 U1.5 U3.2 U4.3 U4.5 | length 365
  Top Layer w22: U1.5@1401.02,1650 v1(1436,1650) ; U4.5@1401.02,2258 1401.5,2258.47 1437.47,2258.47 1473.2,2294.2 1502.18,2294.2 U4.3@1503.39,2295.4
  Top Layer w40: C10.2@3420,2183 v1(3455,2183) v1(3477,2183) 3547,2183 3564.8,2165.2 U3.2@3564.8,2105.22
  other v1: 1493,1718 1527,1718 1493,1861 1527,1861 2989.59,2002.8 3021.75,2002.8 3054.25,2002.8 3086.75,2002.8 3120,2002.8 2989.59,2032.8 3120,2032.8 2989.59,2063.3 3120,2063.3 2989.59,2093.8 3120,2093.8 2989.59,2124.3 3120,2124.3 2989.59,2154.8 3120,2154.8 1102,2502 1134,2502 1102,2532.5 1134,2532.5 1102,2563 1134,2563 1102,2593.5 1134,2593.5 1102,2624 1134,2624
BATT#: F1.1 P1.2
  other v1: 910,2382 940.5,2382 971,2382 1001.5,2382 1032,2382 910,2414 940.5,2414 971,2414 1001.5,2414 1032,2414
BOOT0: R8.2 SW1.1 SW1.2 U5.94 | length 909.6
  Top Layer w10: R8.2@4390,2620.5 4444.6,2620.5 SW1.1@4445.05,2620.94 SW1.2@4700.95,2620.94 4700.95,2574.05 4730,2545 4938,2545 5045.69,2437.31 U5.94@5045.69,2287.12
BUT_1: J2.3 R15.2 U5.40 | length 4319.1
  Top Layer w10: v1(5152,1783) 5182.31,1783 5203.17,1762.15 U5.40@5203.17,1676.88 R15.2@5203.17,1585.5
  Top Layer w22: J2.3@1939.57,2676.48 1939.57,2536.43 1965,2511 2378.11,2511 2391,2498.11 v1(2391,2327)
  Bottom Layer w22: v1(2391,2327) 4359,2327 4485,2201 4485,1763 4539,1709 4968,1709 5042,1783 v1(5152,1783)
BUT_2: J3.3 R16.2 U5.41 | length 3959.9
  Top Layer w10: v1(5183,1814) 5222.85,1774.15 U5.41@5222.85,1676.88 5222.85,1630.15 5243.55,1609.45 R16.2@5243.55,1585.5
  Top Layer w22: v1(2421,2367) v1(2421,2558)
  Bottom Layer w22: v1(2421,2367) 4364.25,2367 4517,2214.25 4517,1787 4562,1742 4953,1742 5025,1814 v1(5183,1814) ; v1(2421,2558) 2505,2558 2533.57,2586.57 J3.3@2533.57,2676.48
BUT_3: J4.3 R23.2 U5.42 | length 3030.1
  Top Layer w10: v1(5243,1798) 5242.77,1797.77 5242.77,1677.11 U5.42@5242.54,1676.88 5242.54,1639.46 5255,1627 5276,1627 5283.8,1619.2 R23.2@5283.8,1585.5
  Bottom Layer w22: J4.3@3119,2676.48 3395.48,2400 4377.92,2400 4550,2227.92 4550,1816 4593,1773 4938,1773 5009,1844 5197,1844 v1(5243,1798)
DI_LCD: J7.6 U6.17 | length 211.7
  Top Layer w10: J7.6@7038,2719 7038,2675 7124.61,2588.39 U6.17@7124.61,2543.17
E_LCD: J7.8 U6.15 | length 201.6
  Top Layer w10: U6.15@7175.8,2543.17 7175.8,2594.8 7238,2657 J7.8@7238,2719
EARTH: D10.1 D11.1 D12.1 D13.1 D14.1 D15.1 D22.1 D23.1 D24.1 D25.1 D26.1 D27.1 | length 1400.9
  Top Layer w40: D25.1@7007,644.19 7007,659 7022,674 7249,674 7311,612 8322,612 8339.8,594.2 D26.1@8339.8,580.16
  other v1: 1003,616 1035,616 2456,616 2488,616 3937,616 3969,616 5417,616 5449,616 6903,616 6935,616 1003,646.5 1035,646.5 2456,646.5 2488,646.5 3937,646.5 3969,646.5 5417,646.5 5449,646.5 6903,646.5 6935,646.5 1003,677 1035,677 2456,677 2488,677 3937,677 3969,677 5417,677 5449,677 6903,677 6935,677
ESP_RX: J20.4 U5.92 | length 3726.3
  Top Layer w10: v1(5075,2189) 5075,2211.66 5084.15,2220.81 5084.15,2286.21 U5.92@5085.06,2287.12 ; v1(8485,2353) 8562.45,2353 J20.4@8564.61,2355.16
  Bottom Layer w10: v1(5075,2189) 8433,2189 8485,2241 v1(8485,2353)
ESP_TX: J20.3 U5.91 | length 3688.3
  Top Layer w10: v1(5105,2165) U5.91@5105,2286.86 ; v1(8512.06,2305.94) J20.3@8564.61,2305.94
  Bottom Layer w10: v1@5101,2165 8447,2165 8512.06,2230.06 v1(8512.06,2305.94)
GND: C1.1 C2.1 C4.1 C5.1 C6.1 C7.1 C8.1 C9.2 C10.1 C11.2 C12.1 C13.1 C14.1 C17.2 C18.1 C19.2 C20.1 C21.1 C22.2 C23.1 C24.1 C25.1 C26.1 C27.1 C28.1 C29.1 C30.2 C31.2 C32.1 C33.1 C34.1 C35.1 C36.1 C37.1 C38.1 C39.1 C40.1 C41.1 C42.1 C43.1 C44.1 D2.1 D3.1 J2.4 J3.4 J4.4 J5.3 J7.3 J7.20 J8.2 J10.2 J12.2 J14.2 J16.2 J20.5 J20.MP1 J20.MP2 P1.1 PT1.3 R2.1 R4.1 R6.1 R7.1 R8.1 R15.1 R16.1 R23.1 R27.1 R28.1 R29.1 R30.1 R31.1 R32.1 R51.2 R53.2 R55.2 R60.1 R61.1 R62.1 R63.1 R64.1 R65.1 R84.2 R86.2 R88.2 SW2.3 SW2.4 U1.1 U2.2 U3.4 U3.8 U4.1 U5.10 U5.20 U5.27 U5.49 U5.74 U5.99 U6.11 U7.11 U8.7 U9.7 U10.7 U11.5 U12.5 U13.5 U14.7 U15.7 U16.7 U17.5 U18.5 U19.5 X1.2 X1.4 | length 3277.1
  Top Layer w10: X1.4@4569.49,1981.46 4600,1960 4632.8,1936 X1.2@4656.1,1914.54 ; v1(4759,1915) 4770.94,1903.06 4770.94,1857.06 4783.8,1844.2 U5.20@4858.68,1844.2 ; U5.10@4858.68,2041.06 v1(4899.94,2041.06) ; C23.1@4907.8,1605 4907.8,1631.14 4913.65,1637 4940.4,1637 4947.26,1643.86 U5.27@4947.26,1676.88 ; v1(4947.26,2247.26) U5.99@4947.26,2287.12 ; U5.49@5380.33,1676.88 5380.33,1646.86 5388.19,1639 5411.94,1639 5417.8,1633.14 C25.1@5417.8,1594 ; U5.74@5468.91,2198.54 5469.38,2199 5497,2199 5504,2206 5504,2262 5514,2272 C27.1@5555.8,2272 ; U6.11@7278.16,2543.17 7278.16,2578.14 7284.02,2584 v1(7313,2584) ; U7.11@7842.36,2543.17 7842.36,2578.14 7848.22,2584 v1(7877.2,2584)
  Top Layer w22: R28.1@81,1838.44 v1(105.44,1838.44) ; R31.1@81,1962.33 v1(105.44,1962.33) ; R27.1@83,1590.67 R27.1@84,1590.67 ; R30.1@84,1714.56 v1(108.44,1714.56) ; R27.1@84,1590.67 127.69,1590.69 v1(128,1591) ; C33.1@525.5,1295 v1(525.5,1322.7) ; U11.5@1198.06,1047 v1(1243,1047) ; R2.1@1283.2,1656 v1(1313,1656) ; R4.1@1291.2,2272.5 v1(1323.5,2272.5) ; v1(1465.6,1612.6) U1.1@1503.39,1612.6 ; U12.5@2626.06,1046 v1(2671,1046) ; v1(2932.7,1043) U10.7@3069.5,1043 ; C35.1@3376.3,1295 v1(3376.3,1322.7) ; U13.5@4047.27,1048.5 v1(4092.2,1048.5) ; U14.7@4461.5,1043 4505,1043 ; C39.1@4766.5,1294 4768.5,1296 4792.56,1296 4803.56,1307 v1(4804,1307) ; U17.5@5437.27,1048 v1(5482.2,1048) ; v1(5763,1043) U15.7@5899.8,1043 ; C40.1@6205.3,1295 v1(6205.3,1322.7) ; U18.5@6879.06,1047 v1(6924,1047) ; v1(7159,1000) 7202,1043 U16.7@7339.8,1043 ; v1(7231.12,46) 7231.12,69.11 7244.01,82 R29.1@7278,82 ; v1(7397,46) 7397,69.11 7409.89,82 R32.1@7443.88,82 ; v1(7562.77,48) 7562.77,71.11 7575.66,84 R60.1@7609.65,84 ; C41.1@7645.3,1295 C41.1@7645.3,1295.2 ; C41.1@7645.3,1296.5 7676.06,1296.5 7694.56,1315 v1(7695,1315) ; v1(7728.54,48) 7728.54,71.11 7741.42,84 R63.1@7775.41,84 ; v1(7894.3,49) 7894.3,72.11 7907.19,85 R61.1@7941.18,85 ; v1(8060.07,45) 8060.07,68.11 8072.96,81 R64.1@8106.95,81 ; U19.5@8317.06,1047 v1(8362,1047) ; v1(8680,1731.37) R65.1@8680,1753.68 ; v1(8680,1858) R62.1@8680,1880.32
  Top Layer w40: C8.1@2161.8,1538 v1(2161.8,1582.8) ; v1(4851,2333) C26.1@4851,2364 ; C27.1@5555.8,2272 v1(5607,2272) ; v1(6738,2537) J7.3@6738,2719 ; PT1.3@6894.93,2398.83 6895,2398.9 v1(6895,2451)
  Bottom Layer w30: 6951,1000 v1(7159,1000)
  Bottom Layer w40: v1(6123,2551) J5.3@6123,2717.56
  other v1: 1574,1043 6925,1197 6953,1197 5488,1209 5515,1209 8638,2021 8668.5,2021 8699,2021 8638,2053 8668.5,2053 8699,2053 4789,2162 724,2166.8 756,2166.8 724,2197.3 756,2197.3 1445,2218 1479,2218 724,2227.8 756,2227.8 724,2258.3 756,2258.3 724,2288.8 756,2288.8 1400,2385 1428,2386 1456,2386
MCU_UART1_RX: R9.2 SB6.2 U8.4 U8.5 | length 6050.1
  Top Layer w22: SB6.2@884.3,1195.3 884.3,1202.44 884,1202.74 884,1396 904,1416 v1(1374,1416) ; v1@4359,1825 v1(4609,1825) ; R9.2@5573.3,2095 v1(5596,2095)
  Bottom Layer w22: v1(305.81,1144) 305.81,1193.81 305,1194.62 305,1225 362,1282 v1(884,1282) ; v1(1374,1416) 1410,1380 4103,1380 4358,1635 v1(4358,1826) ; v1(4609,1825) 4888,1825 5158,2095 v1(5596,2095)
MCU_UART1_TX: R10.2 R24.1 SB9.2 U8.1 | length 6629.5
  Top Layer w22: SB9.2@884.15,1043.35 884.15,1007.15 v1(884,1007) 857,1007 826,1038 826,1396 883,1453 v1(1390,1453) ; v1@4319.75,1857.69 4320.44,1857 v1@4606.56,1857 ; R10.2@5573.3,2134 v1(5596,2134)
  Bottom Layer w22: v1(276,1341) 276,1051 320,1007 v1(884,1007) ; v1(1390,1453) 1426.3,1416.7 4082.7,1416.7 4319,1653 v1(4319,1858) ; v1(4607,1857) 4869,1857 5146,2134 v1(5596,2134)
MCU_UART2_RX: R11.2 SB7.2 U9.4 U9.5 | length 4513.3
  Top Layer w22: SB7.2@2316.3,1197 v1(2316.3,1222.7) 2316.3,1439.3 2361,1484 4775.75,1484 4807.75,1452 5499.25,1452 5568.3,1521.04 R11.2@5568.3,1739
  Bottom Layer w22: v1(1648.6,1169) 1763.6,1284 2099,1284 2160.3,1222.7 v1(2316.3,1222.7)
MCU_UART2_TX: R12.2 R25.1 SB10.2 U9.1 | length 5232.4
  Top Layer w22: SB10.2@2316.15,1043.35 2316.15,1007.15 v1(2316,1007) 2284,1007 2264,1027 2264,1435 2345,1516 4789,1516 4821,1484 5486,1484 5532,1530 v1(5532,1682) ; R12.2@5568.3,1778 5602.11,1778 5615,1765.11 v1(5615,1682)
  Bottom Layer w22: v1(1606.6,1342) 1606.6,1040.89 1640.49,1007 v1(2316,1007) ; v1@5532.44,1682 v1@5614.56,1682
MCU_UART3_RX: R13.2 SB8.2 U10.4 U10.5 | length 3327
  Top Layer w22: SB8.2@3734.59,1197 v1(3734.59,1222.7) ; v1(4122,941) 4278,941 4313,976 v1(4406,976) ; v1(5122.8,1522.8) R13.2@5122.8,1548.5
  Bottom Layer w22: v1(3068.3,1169) 3183.3,1284 3673.3,1284 ; v1(3734.59,1222.7) 3673.3,1284 ; v1(4122,941) 3976,941 3955,962 3955,1263.11 3934.11,1284 3673.3,1284 ; v1(4406,976) 5244,976 5287,1019 5287,1303 5122.8,1467.2 v1(5122.8,1522.8)
MCU_UART3_TX: R14.2 R26.1 SB11.2 U10.1 | length 3328.1
  Top Layer w22: v1(3734.3,1007) 3734.45,1007.15 SB11.2@3734.45,1043.35 ; v1(4122,908) 4297,908 4324,935 v1(4409,935) ; v1(5163.05,1522.8) R14.2@5163.05,1548.5
  Bottom Layer w22: v1(3026.3,1342) 3026.3,1040.89 3060.19,1007 v1(3734.3,1007) 3833.3,908 v1(4122,908) ; v1(4409,935) 5244.01,935 5316,1006.99 5316,1317 5163.05,1469.95 v1(5163.05,1522.8)
MCU_UART4_RX: R17.2 SB15.2 U14.4 U14.5 | length 2848.4
  Top Layer w22: v1(4354,1199) 4455.5,1199 U14.4@4461.5,1193 ; v1(4391,1892) 4391,2455 4445,2509 4940.59,2509 4995.8,2453.8 R17.2@4995.8,2393.5 ; SB15.2@5126.59,1197 v1(5126.59,1222.7)
  Bottom Layer w22: v1(4354,1199) 4354,1365 4391,1402 v1(4391,1892) ; v1(4460.3,1169) 4565.3,1274 5036,1274 5087.3,1222.7 v1(5126.59,1222.7)
MCU_UART4_TX: R18.2 R57.1 SB18.2 U14.1 | length 2762.9
  Top Layer w22: v1(4428,1892) 4428,2431 4475,2478 4930,2478 4955.8,2452.2 R18.2@4955.8,2393.5 ; v1(5126.3,1007) 5126.45,1007.15 SB18.2@5126.45,1043.35
  Bottom Layer w22: v1(4428,1892) 4428,1891.56 4427,1890.56 v1(4427,1341) 4427,1187.37 4426,1186.37 4426,1033.19 4452.19,1007 v1(5126.3,1007)
MCU_UART5_RX: R19.2 SB16.2 U15.4 U15.5 | length 1781.9
  Top Layer w22: R19.2@5575,1919 5691.11,1919 5704,1906.11 5704,1238 5749,1193 U15.4@5899.8,1193 ; SB16.2@6564.89,1197 v1(6564.89,1222.7)
  Bottom Layer w22: v1(5898.6,1169) 6013.6,1284 6503.6,1284 v1(6564.89,1222.7)
MCU_UART5_TX: R20.2 R58.1 SB19.2 U15.1 | length 1948.3
  Top Layer w20: R20.2@5575,1960 5728.28,1960 5740,1948.28 5740,1857
  Top Layer w22: 5740,1857 5740,1353 5754,1339 5853.6,1339 v1(5856.6,1342) ; v1(6564.6,1007) 6564.75,1007.15 SB19.2@6564.75,1043.35
  Bottom Layer w22: v1(5856.6,1342) 5856.6,1040.89 5890.49,1007 v1(6564.6,1007)
MCU_UART6_RX: R21.2 SB17.2 U16.4 U16.5 | length 5921.1
  Top Layer w22: R21.2@4690.3,2261 v1(4690.3,2285.7) ; U16.4@7339.8,1193 7183,1193 7134,1242 7134,1687.55 7394.95,1948.5 7838.5,1948.5 7896,2006 v1@7896,2293 ; SB17.2@8004.89,1197 v1(8004.89,1222.7)
  Bottom Layer w22: v1(4690.3,2285.7) 4690.3,2331.3 4729,2370 5682,2370 5760,2292 v1(7896,2292) ; v1(7359,1170) 7473,1284 7943.6,1284 v1(8004.89,1222.7)
MCU_UART6_TX: R22.2 R59.1 SB20.2 U16.1 | length 6207.6
  Top Layer w22: v1(4659.59,2211) R22.2@4684.3,2211 ; U16.1@7313.59,1340.5 7187.5,1340.5 7164,1364 7164,1673 7408,1917 7851.55,1917 7927,1992.45 v1(7927,2325) ; v1(8004.6,1007) 8004.75,1007.15 SB20.2@8004.75,1043.35
  Bottom Layer w22: v1(4659.59,2211) 4659.59,2346.59 4717,2404 5696.08,2404 5775.08,2325 v1(7927,2325) ; v1(7327,1343) 7327,1046 7366,1007 v1(8004.6,1007)
NetC3_1: C3.1 L1.1 U1.2 | length 472.9
  Top Layer w22: C3.1@1288,1613 1288,1573.89 1300.89,1561 1584,1561 ; U1.2@1503.39,1650 1582.09,1650 L1.1@1620.09,1688
NetC3_2: C3.2 U1.6 | length 52.8
  Top Layer w22: C3.2@1348.4,1612.6 1348.6,1612.8 1400.82,1612.8 U1.6@1401.02,1612.6
NetC7_2: C7.2 U2.4
NetC12_2: C12.2 U3.7 | length 76.2
  Top Layer w22: C12.2@3814.8,2029 U3.7@3814.8,2105.22
NetC15_1: C15.1 D3.2 L2.1 U3.1 | length 605.7
  Top Layer w22: D3.2@3309,2137 3309,2036.89 3321.89,2024 ; 3514.8,2029 U3.1@3514.8,2105.22 ; 3517,2029 3522,2024 3527.68,2024 C15.1@3577.8,2024 L2.1@3577.8,1680
  Top Layer w40: L2.1@3574.8,1677 L2.1@3577.8,1680
NetC15_2: C15.2 U3.3 | length 81.2
  Top Layer w22: C15.2@3614.8,2024 U3.3@3614.8,2105.22
NetC16_1: C16.1 L3.1 U4.2 | length 485.7
  Top Layer w22: C16.1@1288.2,2222 1288.2,2182.89 1301.09,2170 v1(1446,2170) ; U4.2@1503.39,2258 v1(1548,2258) 1609.09,2258 L3.1@1614.09,2263
  Bottom Layer w22: v1(1446,2170) 1515,2170 1548,2203 v1(1548,2258)
NetC16_2: C16.2 U4.6 | length 53.4
  Top Layer w22: C16.2@1348.2,2222 1348.91,2221.3 1400.32,2221.3 U4.6@1401.02,2220.6
NetC25_2: C25.2 U5.48 | length 98.5
  Top Layer w10: C25.2@5337.8,1594 5339.14,1595.35 5339.14,1633.14 5345,1639 5355,1639 5361,1645 5361,1676.53 U5.48@5360.65,1676.88
NetC27_2: C27.2 U5.73 | length 92.3
  Top Layer w10: U5.73@5468.91,2178.85 5502.85,2178.85 5516,2192 C27.2@5555.8,2192
NetC30_1: C30.1 U5.8 X2.1 | length 215
  Top Layer w10: X2.1@4705.8,2149.43 4750.72,2149.43 4756.57,2143.57 4756.57,2086.28 4762.43,2080.43 U5.8@4858.68,2080.43
NetC31_1: C31.1 U5.9 X2.2 | length 156.9
  Top Layer w10: X2.2@4705.8,2051 4792,2051 4801.74,2060.74 U5.9@4858.68,2060.74
NetC33_2: C33.2 D4.1 R33.2 U8.13 | length 371.5
  Top Layer w22: v1(373,1244) 373,1280.11 385.89,1293 U8.13@431.8,1293
  Bottom Layer w22: v1(373,1244) 422,1195 v1(624,1195)
NetC34_2: C34.2 D5.1 R34.2 U9.13 | length 371.5
  Top Layer w22: v1(1803.6,1244) 1803.6,1280.11 1816.49,1293 U9.13@1862.39,1293
  Bottom Layer w22: v1(1803.6,1244) 1852.6,1195 v1(2054.6,1195)
NetC35_2: C35.2 D6.1 R35.2 U10.13 | length 371.5
  Top Layer w22: v1(3223.3,1244) 3223.3,1280.11 3236.19,1293 U10.13@3282.09,1293
  Bottom Layer w22: v1(3223.3,1244) 3272.3,1195 v1(3474.3,1195)
NetC39_2: C39.2 D16.1 R66.2 U14.13 | length 371.5
  Top Layer w22: v1(4615.3,1244) 4615.3,1280.11 4628.19,1293 U14.13@4674.09,1293
  Bottom Layer w22: v1(4615.3,1244) 4664.3,1195 v1(4866.3,1195)
NetC40_2: C40.2 D17.1 R67.2 U15.13 | length 371.5
  Top Layer w22: v1(6053.6,1244) 6053.6,1280.11 6066.49,1293 U15.13@6112.39,1293
  Bottom Layer w22: v1(6053.6,1244) 6102.6,1195 v1(6304.6,1195)
NetC41_2: C41.2 D18.1 R68.2 U16.13 | length 371.5
  Top Layer w22: v1(7493.6,1244) 7493.6,1280.11 7506.49,1293 U16.13@7552.39,1293
  Bottom Layer w22: v1(7493.6,1244) 7542.6,1195 v1(7744.6,1195)
NetD1_1: D1.1 J1.1 | length 7
  Bottom Layer w10: J1.1@1361,2718 J1.1@1368,2718
  other v1: 1203,2068 1203,2096.5 1204,2125
NetD1_2: D1.2 D2.2 F1.2
NetD4_2: D4.2 R33.1 R36.2 U8.10 | length 95.8
  Top Layer w10: U8.10@431.8,1143 524.8,1143 D4.2@526.8,1141
NetD5_2: D5.2 R34.1 R37.2 U9.10 | length 95.8
  Top Layer w10: U9.10@1862.39,1143 1955.39,1143 D5.2@1957.39,1141
NetD6_2: D6.2 R35.1 R38.2 U10.10 | length 95.8
  Top Layer w10: U10.10@3282.09,1143 3375.09,1143 D6.2@3377.09,1141
NetD7_1: D7.1 D11.2 F3.1 R48.1 R52.2 U11.6 | length 473.8
  Top Layer w22: D11.2@1114.8,801.67 1114.8,1084.11 1127.68,1097 U11.6@1196.06,1097 ; R52.2@1312.8,1096.5 1387.56,1096.5 D7.1@1408.8,1075.26
NetD7_2: D7.2 D10.2 F2.1 R48.2 R51.1 U11.7 | length 742
  Top Layer w22: D10.2@929,801.67 929,947 948,966 1022,966 1045,989 1045,1124 1068,1147 U11.7@1196.06,1147 ; R51.1@1311.8,1154.5 1395.91,1154.5 1408.8,1167.39 D7.2@1408.8,1232.74
NetD8_1: D8.1 D13.2 F5.1 R49.1 R54.2 U12.6 | length 466.8
  Top Layer w22: D13.2@2564.8,801.67 2563,803.46 2563,1084.11 2575.89,1097 U12.6@2628.06,1097 ; R54.2@2744.8,1096.5 D8.1@2858,1096.5
NetD8_2: D8.2 D12.2 F4.1 R49.2 R53.1 U12.7 | length 693.1
  Top Layer w22: D12.2@2382,801.67 2381,802.67 2381,912 2473,1004 2473,1124 2496,1147 U12.7@2628.06,1147 ; R53.1@2743.8,1154.5 2827.91,1154.5 2840.8,1167.39 D8.2@2840.8,1232.74
NetD9_1: D9.1 D15.2 F7.1 R50.1 R56.2 U13.6 | length 658.9
  Top Layer w22: D15.2@4046,801.67 4049,804.67 4049,953 4076,980 4263.91,980 4276.8,992.89 D9.1@4276.8,1075.26 ; R50.1@4100.09,1098 R56.2@4162,1098 D9.1@4279.71,1098
NetD9_2: D9.2 D14.2 F6.1 R50.2 R55.1 U13.7 | length 839.5
  Top Layer w22: 3808.11,800.5 D14.2@3849.61,842 ; D14.2@3863,801.67 3903,841.67 ; R55.1@4162.09,1154.5 4246.21,1154.5 4259.09,1167.39 D9.2@4259.09,1232.74
  Top Layer w25: 3784.75,800.5 3808.11,800.5 3862.5,800.5 3901,839 3901,1098 3950,1147 U13.7@4046.06,1147
NetD16_2: D16.2 R66.1 R69.2 U14.10 | length 95.8
  Top Layer w10: U14.10@4674.09,1143 4767.09,1143 D16.2@4769.09,1141
NetD17_2: D17.2 R67.1 R70.2 U15.10 | length 95.8
  Top Layer w10: U15.10@6112.39,1143 6205.39,1143 D17.2@6207.39,1141
NetD18_2: D18.2 R68.1 R71.2 U16.10 | length 95.8
  Top Layer w10: U16.10@7552.39,1143 7645.39,1143 D18.2@7647.39,1141
NetD19_1: D19.1 D23.2 F9.1 R81.1 R85.2 U17.6 | length 556.4
  Top Layer w22: U17.6@5460.3,1097 R81.1@5499,1097 ; D23.2@5528,801.67 5529.21,802.88 5529.21,908.21 5549.09,928.09 5638.21,928.09 5651.09,940.98 D19.1@5651.09,1075.26 ; 5530.8,1098 D19.1@5671.71,1098
NetD19_2: D19.2 D22.2 F8.1 R81.2 R84.1 U17.7 | length 589.8
  Top Layer w22: D22.2@5343,801.67 5368.5,827.17 5368.5,1134.11 5381.39,1147 U17.7@5442.27,1147 ; R84.1@5554.09,1154.5 5638.21,1154.5 5651.09,1167.39 D19.2@5651.09,1232.74
NetD20_1: D20.1 D25.2 F11.1 R82.1 R87.2 U18.6 | length 476.4
  Top Layer w22: U18.6@6898.6,1097 R82.1@6937.3,1097 ; 6969.09,1098 D20.1@7082,1098 ; D25.2@7007,801.67 7015,809.67 7049.46,809.67 7081.8,842 D20.1@7081.8,1075.26
NetD20_2: D20.2 D24.2 F10.1 R82.2 R86.1 U18.7 | length 546.3
  Top Layer w22: D24.2@6829,801.67 6829,1131.33 6841.89,1144.22 6876.28,1144.22 U18.7@6879.06,1147 ; R86.1@6992.39,1154.5 7068.91,1154.5 7081.8,1167.39 D20.2@7081.8,1232.74
NetD21_1: D21.1 D27.2 F13.1 R83.1 R89.2 U19.6 | length 787.8
  Top Layer w22: U19.6@8312.06,1092 U19.6@8317.06,1097 8248,1097 8227,1076 8227,991 8259,959 8420,959 8462.8,916.2 D27.2@8462.8,737.64 ; U19.6@8338.6,1097 R83.1@8377.3,1097 ; 8409.09,1098 D21.1@8522,1098
NetD21_2: D21.2 D26.2 F12.1 R83.2 R88.1 U19.7 | length 743.3
  Top Layer w22: U19.7@8317.06,1147 8314.56,1149.5 8223.5,1149.5 8189,1115 8189,984 8339.8,833.2 D26.2@8339.8,737.64 ; R88.1@8432.39,1154.5 8508.91,1154.5 8521.8,1167.39 D21.2@8521.8,1232.74
NetF2_2: F2.2 J9.1
NetF3_2: F3.2 J9.2
NetF4_2: F4.2 J11.1
NetF5_2: F5.2 J11.2
NetF6_2: F6.2 J13.1
NetF7_2: F7.2 J13.2
NetF8_2: F8.2 J15.1
NetF9_2: F9.2 J15.2
NetF10_2: F10.2 J17.1
NetF11_2: F11.2 J17.2
NetF12_2: F12.2 J18.1
NetF13_2: F13.2 J18.2
NetJ7_1: J7.1 U6.13 | length 849
  Top Layer w10: U6.13@7226.98,2543.17 v1(7226.98,2584.02)
  Bottom Layer w10: J7.1@6538,2719 6538,2611 6564.98,2584.02 v1(7226.98,2584.02)
NetJ7_2: J7.2 U6.12 | length 781.3
  Top Layer w10: U6.12@7252.57,2543.17 v1(7252.57,2608.43)
  Bottom Layer w10: J7.2@6638,2719 6638,2624 6653.57,2608.43 v1(7252.57,2608.43)
NetJ7_9: J7.9 U7.20 | length 403.6
  Top Layer w10: J7.9@7338,2719 7338,2656.91 7403.95,2590.95 7599.05,2590.95 7612.05,2577.95 U7.20@7612.05,2543.17
NetJ7_10: J7.10 U7.18 | length 372.8
  Top Layer w10: J7.10@7438,2719 7438,2628 7456,2610 7633,2610 7663.23,2579.77 U7.18@7663.23,2543.17
NetJ7_11: J7.11 U7.17 | length 291.6
  Top Layer w10: J7.11@7538,2719 7538,2643 7554,2627 7645,2627 7688.82,2583.18 U7.17@7688.82,2543.17
NetJ7_12: J7.12 U7.16 | length 207.5
  Top Layer w10: J7.12@7638,2719 7638,2667 7714.41,2590.59 U7.16@7714.41,2543.17
NetJ7_13: J7.13 U7.15 | length 176.7
  Top Layer w10: J7.13@7738,2719 7740.14,2716.86 U7.15@7740.14,2543.17
NetJ7_14: J7.14 U7.14 | length 205.8
  Top Layer w10: U7.14@7765.59,2543.17 7765.59,2602.59 7837.47,2674.47 7837.47,2718.47 J7.14@7838,2719
NetJ7_15: J7.15 U7.13 | length 279.4
  Top Layer w10: U7.13@7791.18,2543.17 7791.18,2600.18 7844,2653 7917,2653 7938,2674 J7.15@7938,2719
NetJ7_16: J7.16 U7.12 | length 369.8
  Top Layer w10: U7.12@7817,2535.65 7817,2598 7853,2634 8015,2634 8038,2657 J7.16@8038,2719
NetLED1_1: LED1.1 U8.6 | length 521.1
  Top Layer w22: v1(103,1501) LED1.1@103.03,1540.54 ; v1(175.81,1093) U8.6@219.2,1093
  Bottom Layer w22: v1(103,1501) 175.81,1428.19 v1(175.81,1093)
NetLED1_2: LED1.2 R27.2
NetLED2_1: LED2.1 U9.6 | length 1871.9
  Top Layer w22: v1(103.01,1758.12) LED2.1@103.03,1788.76 ; v1(1565.6,1093) U9.6@1649.8,1093
  Bottom Layer w22: v1(103.01,1758.12) 932.88,1758.12 1565.6,1125.4 v1(1565.6,1093)
NetLED2_2: LED2.2 R28.2
NetLED3_1: LED3.1 U10.6 | length 5372.3
  Top Layer w22: v1(2962.7,1093) U10.6@3069.5,1093 ; LED3.1@7326.11,103.53 v1@7356.73,103.53
  Bottom Layer w22: v1(2962.7,1093) 2962.7,1014.25 3166.95,810 7308,810 7356.75,761.25 v1@7356.75,103.95
  other v1: 7356.75,103.51
NetLED3_2: LED3.2 R29.2
NetLED4_1: LED4.1 U8.2 U8.11 | length 814.9
  Top Layer w22: v1(103,1634) LED4.1@103.03,1664.65 ; U8.2@219.2,1293 308.56,1293 309.56,1294 v1(310,1294) 310,1258 375,1193 U8.11@431.8,1193
  Bottom Layer w22: v1(103,1634) 244,1634 310,1568 v1(310,1294)
NetLED4_2: LED4.2 R30.2
NetLED5_1: LED5.1 U9.2 U9.11 | length 2075.5
  Top Layer w22: v1(103.01,1882.24) LED5.1@103.03,1912.87 ; v1(1565.6,1293) U9.2@1649.8,1293 1703.6,1293 1803.6,1193 U9.11@1862.39,1193
  Bottom Layer w22: v1(103.01,1882.24) 855.76,1882.24 1445,1293 v1(1565.6,1293)
NetLED5_2: LED5.2 R31.2
NetLED6_1: LED6.1 U10.2 U10.11 | length 5915.2
  Top Layer w22: v1(2993.14,1293) U10.2@3069.5,1293 3123.3,1293 3223.3,1193 U10.11@3282.09,1193 ; LED6.1@7491.88,103.53 v1(7522.51,103.51)
  Bottom Layer w22: v1(2993.14,1293) 2993.14,1026.86 3179.56,840.44 7427.56,840.44 7522.76,745.24 v1@7522.76,103.51
NetLED6_2: LED6.2 R32.2
NetLED7_1: LED7.1 U14.6 | length 4416.5
  Top Layer w22: v1(4333,1091) 4333.44,1091 4335.44,1093 U14.6@4461.5,1093 ; LED7.1@7657.65,103.53 v1(7688.28,103.51)
  Bottom Layer w22: v1(4333,1091) 4333,915 4377,871 7585,871 7688.28,767.72 v1(7688.28,103.51)
NetLED7_2: LED7.2 R60.2
NetLED8_1: LED8.1 U15.6 | length 3275.9
  Top Layer w22: v1(5793,1093) U15.6@5899.8,1093 ; LED8.1@7989.18,103.53 v1(8019.82,103.51)
  Bottom Layer w22: v1(5793,1093) 5793,987 5844,936 7938,936 8019.82,854.18 v1(8019.82,103.51)
NetLED8_2: LED8.2 R61.2
NetLED9_1: LED9.1 U16.6 | length 2027
  Top Layer w22: v1@7290,1092.19 7338.98,1092.19 U16.6@7339.8,1093 ; v1@8620.75,1965 8620.75,1964.69 8643.59,1964.69 8656.47,1951.8 LED9.1@8656.47,1930.32
  Bottom Layer w22: v1@7290,1091 v1(7290,1092) 7290,1470 7785,1965 v1(8620,1965)